# Altium PCB LSS-P-PCB-T v3.5.PcbDoc (part 4 of 5)
Units mil, origin at the board's own origin, x right, y up, seen from the top; angles counter-clockwise.
Board outline 2795.28 x 2795.28 mil, 4 copper layers (Top Layer, Power, Ground, Bottom Layer), stack 62.08 mil thick; 167 components, 123 nets, 589 pads, 650 vias.
Unrouted connection lines stored in the file: 2.
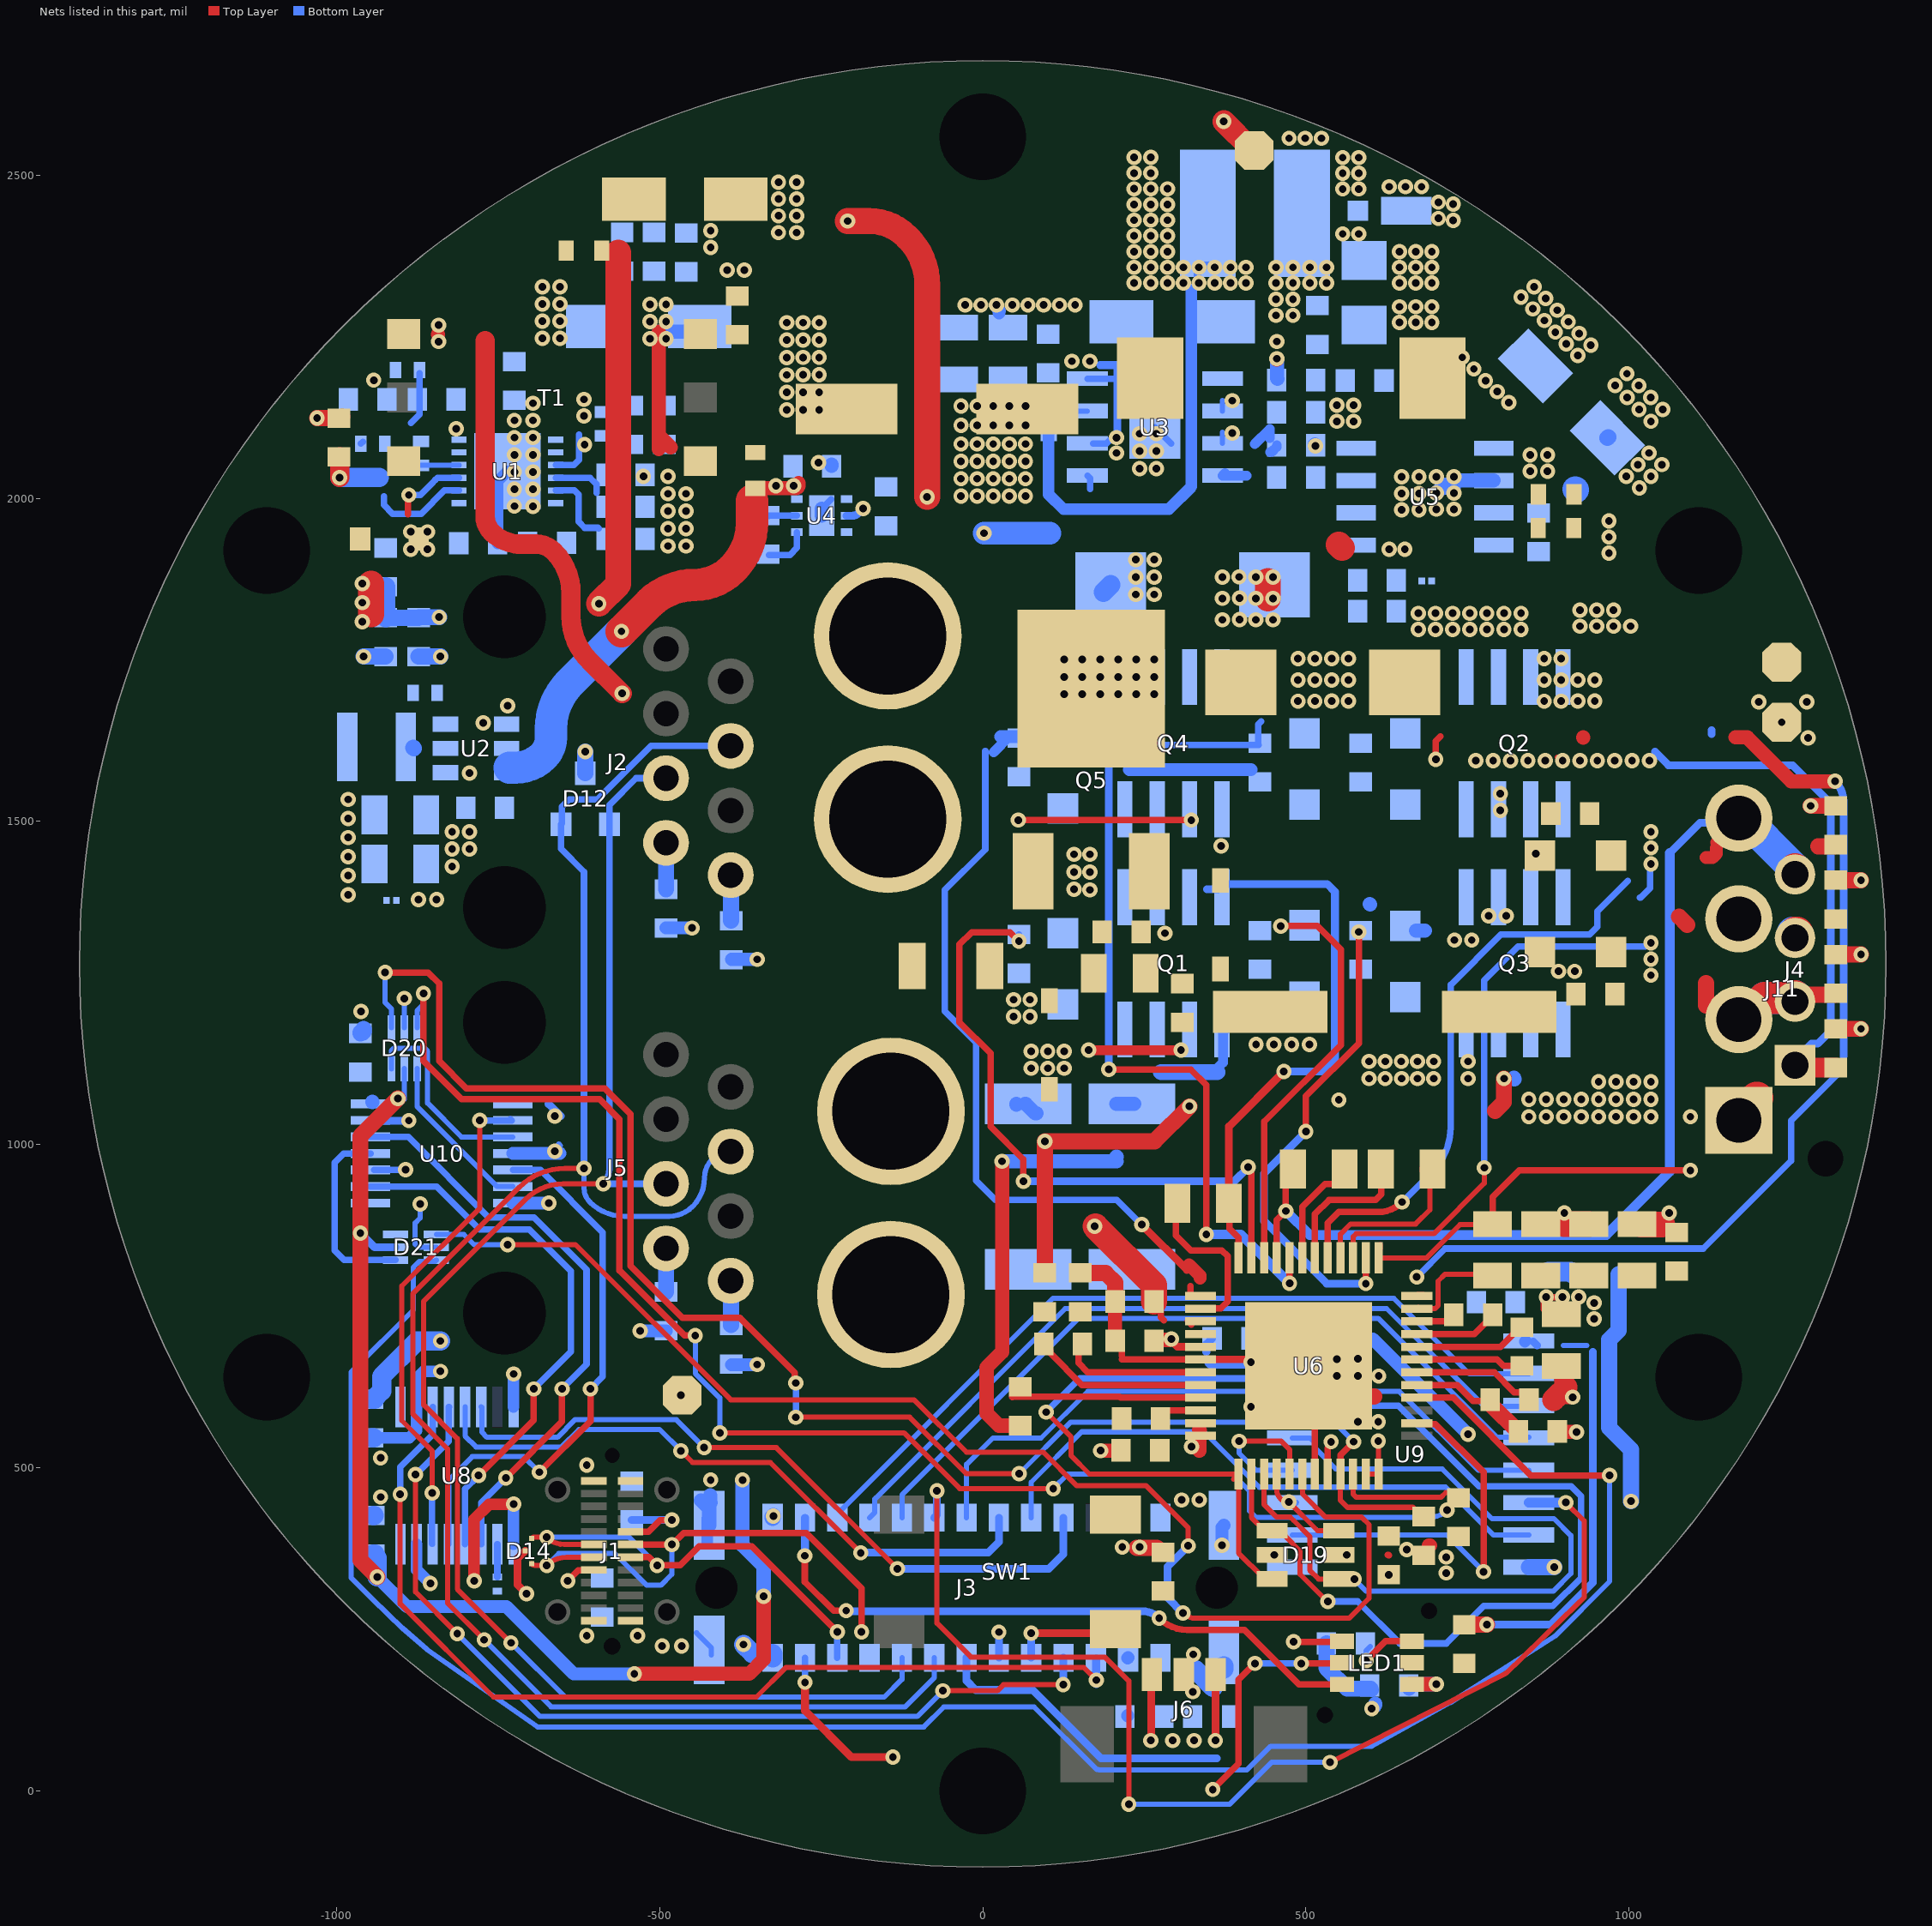
[diagram p4: the nets of this part, all layers, seen from the top]

## Part data (continued)
U5: "1.5-A boost, buck, inverting switching regulator, operation from 0°C to 70°C 8-SOIC 0 to 70", Case/Package=D, Manufacturer="Texas Instruments", Max Input Voltage=40V, Max Operating Temperature=70°C, Max Output Current=750mA, Min Input Voltage=3V, Min Operating Temperature=0°C, Min Output Voltage=1.55V, Output Current=1.5A, Package Quantity=1, Quiescent Current=4mA, Supplier Part Number 1=296-17765-1-ND, Switching Frequency=100kHz, Category="Power Supply Modules", ComponentLink1Description=https://datasheet.ciiva.com/7408/1862376-7408060.pdf?src-supplier=Newark, ComponentLink1URL=https://datasheet.ciiva.com/7408/1862376-7408060.pdf?src-supplier=Newark, ComponentLink2Description=https://datasheet.ciiva.com/2025/mc33063a-2025162.pdf?src-supplier=Digi-Key, ComponentLink2URL=https://datasheet.ciiva.com/2025/mc33063a-2025162.pdf?src-supplier=Digi-Key, ComponentLink3Description=https://datasheet.ciiva.com/2025/mc33063a-2025161.pdf?src-supplier=Digi-Key, ComponentLink3URL=https://datasheet.ciiva.com/2025/mc33063a-2025161.pdf?src-supplier=Digi-Key, ComponentLink4Description=https://datasheet.ciiva.com/2025/mc33063a-2025163.pdf?src-supplier=Digi-Key, ComponentLink4URL=https://datasheet.ciiva.com/2025/mc33063a-2025163.pdf?src-supplier=Digi-Key, Contact Plating=Gold, Lead Free="Lead Free", Manufacturer Part Number=MC34063ADR, Max Output Voltage=40V, Number of Outputs=1, Number of Pins=8, Output Type=Adjustable, Output Voltage=40V, Packaging="Tape and Reel", Pricing 1="1=0.78000, 10=0.68400, 25=0.64240, 100=0.52420, 250=0.48688, 500=0.41438, 1000=0.34206 (USD)", Radiation Hardening=No, REACH SVHC="No SVHC", RoHS=Yes, RoHS Compliant=Yes, Stock 1=17204, Supplier 1=Digi-Key, Synchronous Rectifier=No, Termination=SMD/SMT, Topology=Flyback,SEPIC, Weight=0.002561oz
U6: "IC MTR DRVR BIPOLAR 8-60V 48TQFP", Manufacturer=Trinamic, Supplier Part Number 1=1460-TMC5160A-TA-TCT-ND, Manufacturer Part Number=TMC5160A-TA-T, Pricing 1="1=6.83000, 10=6.13000, 25=5.79560, 100=5.02280, 250=4.76524, 500=4.27582, 1000=3.64500 (USD)", RoHS=Yes, Stock 1=15584, Supplier 1=Digi-Key
U8: "DGTL ISO 3000VRMS 4CH GP 16SSOP", LCSC Part Number=C544482, Supplier Part Number=595-ISO7740FDBQR, Category="Integrated Circuits (ICs)", ComponentLink1Description=LCSC, ComponentLink2Description=http://www.ti.com/general/docs/suppproductinfo.tsp?distId=10&amp;gotoUrl=http%3A%2F%2Fwww.ti.com%2Flit%2Fgpn%2Fiso7742&src-supplier=Digi-Key, ComponentLink2URL=http://www.ti.com/general/docs/suppproductinfo.tsp?distId=10&amp;gotoUrl=http%3A%2F%2Fwww.ti.com%2Flit%2Fgpn%2Fiso7742&src-supplier=Digi-Key, ComponentLink3Description=http://www.ti.com/lit/ds/symlink/iso7742.pdf?src-supplier=Digi-Key, ComponentLink3URL=http://www.ti.com/lit/ds/symlink/iso7742.pdf?src-supplier=Digi-Key, Item Type=IC, Pricing="1=2.67, 10=2.34, 50=2.34, 100=1.95, 1000=1.47, 10000=1.2 (USD)", RoHS=Yes, Stock=3733, Supplier=Mouser
U9: "AUTOMOTIVE, GENERAL-PURPOSE, 50-", LCSC Part Number=C5216383, Supplier Part Number=595-ISO6762FQDWRQ1, Category="Integrated Circuits (ICs)", ComponentLink1Description=LCSC, Item Type=IC, Pricing="1=3.36, 10=2.94, 50=2.94, 100=2.48, 1000=1.78, 10000=1.77 (USD)", RoHS=No, Stock=8302, Supplier=Mouser
U10: "IC BUS BUFFER TRI-ST QD 14TSSOP", Case/Package=TSSOP, High Level Output Current=-32mA, Low Level Output Current=64mA, Manufacturer="Texas Instruments", Max Operating Temperature=85°C, Max Supply Voltage=3.6V, Min Operating Temperature=-40°C, Min Supply Voltage=2.7V, Operating Supply Voltage=3.3V, Package Quantity=2000, Quiescent Current=7mA, Supplier Part Number 1=296-8660-1-ND, Category="Logic Gates", ComponentLink1Description=https://datasheet.ciiva.com/41455/001017258-da-01-en-ic-bus-buf-q-sn74lvth125pwr-tssop-14-tid-41455824.pdf?src-supplier=Conrad, ComponentLink1URL=https://datasheet.ciiva.com/41455/001017258-da-01-en-ic-bus-buf-q-sn74lvth125pwr-tssop-14-tid-41455824.pdf?src-supplier=Conrad, ComponentLink2Description=https://datasheet.ciiva.com/46442/1764295-46442090.pdf?src-supplier=Element14, ComponentLink2URL=https://datasheet.ciiva.com/46442/1764295-46442090.pdf?src-supplier=Element14, ComponentLink3Description=https://datasheet.ciiva.com/1834/sn74lvth125-1834408.pdf?src-supplier=Digi-Key, ComponentLink3URL=https://datasheet.ciiva.com/1834/sn74lvth125-1834408.pdf?src-supplier=Digi-Key, ComponentLink4Description=https://datasheet.ciiva.com/1834/sn74lvth125-1834407.pdf?src-supplier=Digi-Key, ComponentLink4URL=https://datasheet.ciiva.com/1834/sn74lvth125-1834407.pdf?src-supplier=Digi-Key, ComponentLink5Description=https://datasheet.ciiva.com/7795/sn74lvth125-7795066.pdf?src-supplier=Element14, ComponentLink5URL=https://datasheet.ciiva.com/7795/sn74lvth125-7795066.pdf?src-supplier=Element14, ComponentLink6Description=https://datasheet.ciiva.com/14301/scbs703i-14301146.pdf?src-supplier=Avnet, ComponentLink6URL=https://datasheet.ciiva.com/14301/scbs703i-14301146.pdf?src-supplier=Avnet, ComponentLink7Description=https://datasheet.ciiva.com/26263/sn74lvth125-26263836.pdf?src-supplier=Avnet+Europe, ComponentLink7URL=https://datasheet.ciiva.com/26263/sn74lvth125-26263836.pdf?src-supplier=Avnet+Europe, Contact Plating=Gold, Height=1.15mm, Lead Free="Lead Free", Length=5mm, Logic Function=Buffer,Inverting, Manufacturer Part Number=SN74LVTH125PWR, Mount="Surface Mount", Number of Bits=4, Number of Bits per Element=1, Number of Channels=4, Number of Elements=4, Number of Gates=4, Number of Input Lines=4, Number of Inputs=4, Number of Output Lines=3, Number of Outputs=4, Number of Pins=14, Output Current=64mA, Packaging="Tape and Reel", Polarity=Non-Inverting, Pricing 1="1=0.64000, 10=0.56000, 25=0.52560, 100=0.42910, 250=0.39856, 500=0.33920, 1000=0.28000 (USD)", Propagation Delay=2.1ns, Radiation Hardening=No, REACH SVHC="No SVHC", RoHS=Yes, RoHS Compliant=Yes, Stock 1=980, Supplier 1=Digi-Key, Turn-On Delay Time=2.1ns, Width=4.4mm

## Free pads (board coordinates)
  round 118.11 hole 133.86 unplated: MH1(0,2559.06) MH2(1108.1,1919.29) MH3(1108.1,639.76) MH4(0,0) MH5(-1108.1,639.76) MH6(-1108.1,1919.29)

## Via types
v1: diameter 23.62, hole 11.81, Top Layer to Bottom Layer, 643 vias
v2: diameter 23.62, hole 11.81, Top Layer to Bottom Layer, tented both sides, 7 vias

## Nets (pads, with @x,y where several pads share a name; then routed paths per layer and width w, separated by ;. In a path a pad name is that pad's centre, name@x,y a point inside that pad or via, vN(x,y) a via of type N, cw(c..) or ccw(c..) an arc to the next point about the centre after c; other vN are vias at no path point)
3V3: C44.2 C45.2 D16.2 FB4.1 L3.2 U2.1 | length 555.9
  Top Layer w40: v1(-594,1837) -563.81,1867.19 -563.81,2380.37
  other v1: -982,1386.5 -982,1416 -982,1445.5 -982,1475 -982,1504.5 -982,1534 -773.03,1652.4 -735,1679
3V3_M: C49.1 D18.2 FB3.1 L1.2 R39.2 | length 7.1
  Top Layer w40: 551,1928 556,1923
  other v1: 629,1921 653.19,1921
3V8: C11.1 C12.1 D2.1 FB2.1 R35.2
  other v1: -681.48,2247.57 -654.27,2247.57 -681.48,2274.14 -654.27,2274.14 -681.48,2300.7 -654.27,2300.7 -681.48,2327.27 -654.27,2327.27 -395.57,2353 -369,2353
5V: C34.1 J3.A1 U4.3 | length 566.2
  Top Layer w40: v1(-209,2429) -175.88,2429 cw(c-175.88,2347.2) -118.04,2405.04 -115.29,2402.29 cw(c-186,2331.58) -86,2331.58 v1(-86,2002)
  Bottom Layer w30: v1(-370,226.26) -356.39,212.64 -325.75,212.64 -325,211.9 J3.A1@-325,205.99
12V: C43.1 C55.1 D17.2 FB1.1 L2.1 R37.1
  other v1: 548,2119 574,2119 1034,2119 1015.5,2137.5 1052.3,2137.3 548,2144 574,2144 1033.8,2155.8 997,2156 978.5,2174.5 1015.3,2174.3 996.8,2192.8 453.87,2283 479.99,2283 453.87,2308 479.99,2308 453.87,2333 479.99,2333 506.1,2333 532.22,2333 645,2333 670,2333 695,2333 453.87,2357.26 479.99,2357.26 506.1,2357.26 532.22,2357.26 645,2357.3 670,2357.3 695,2357.3 645,2381.61 670,2381.61 695,2381.61 557,2409 582,2409 557,2478.59 582,2478.59 557,2502.85 582,2502.85 557,2527.12 582,2527.12 474,2557 499,2557 524,2557
30VDC: F1.2 P1.2 P2.2 | length 3.5
  Top Layer w22: P1.2@-180.71,1471.38 P1.2@-178.87,1469.53
  Top Layer w50: P1.2@-165,1478.37 P1.2@-164.39,1477.76
AH: C23.1 R7.2 U6.8 | length 271.3
  Top Layer w10: C23.1@94.29,691.37 104.29,681.37 104.29,677.4 153.84,627.84 U6.8@336.96,627.84
AL: C23.2 R6.2 U6.7 | length 226.9
  Top Layer w10: C23.2@154.29,691.37 148,685.09 148,662 162.47,647.53 U6.7@336.96,647.53
BH: C24.1 R8.2 U6.9 | length 291.9
  Top Layer w10: 45.78,609.44 46.01,609.67 211.49,609.67 213,608.16 U6.9@336.96,608.16
BL: C24.2 R9.2 U6.10 | length 67
  Top Layer w10: C24.2@270,588.47 U6.10@336.96,588.47
BOOT0: J3.A7 J6.1 RF4.1 | length 575.8
  Top Layer w12: v1@360,75 v1(360,77.81) J6.1@360.21,175.13
  Bottom Layer w12: J3.A7@-25,205.99 -25,170.25 -10.75,156 77.26,156 183.26,50 362,50 ; v1@357.78,72.78 v1@360,75
BOOT1: J3.A12 J6.3 RF3.1 | length 109.1
  Top Layer w12: v1(260.19,77.81) 260.99,78.61 260.99,179.33 J6.3@261.79,180.13
  Bottom Layer w12: RF3.1@220,115 RF3.1@223.31,111.69
  Bottom Layer w20: RF3.1@224,116 RF3.1@224.5,116.5 ; J3.A12@224.5,205.49 J3.A12@225,205.99
BUTTON: C2.2 J3.A9 SW1.3 | length 206.5
  Top Layer w8: C2.2@269,299 C2.2@269,315 ; C2.2@276.5,306 280.5,310 C2.2@283,310 ; C2.2@277.75,304.75 C2.2@283,310 ; C2.2@285.5,310 C2.2@283,310
  Top Layer w12: v1(75,244) 198.91,244 SW1.3@205.32,250.42
  Bottom Layer w8: J3.A9@74,204.99 J3.A9@75,205.99
  Bottom Layer w12: J3.A9@75,205.99 v1(75,244)
CAN_NH: D12.2 J2.4 J3.A6 J5.4 | length 2923
  Top Layer w8: v1(-771.37,233.63) -828,290.26 -828,529 -882,583 -882,769 -717.29,933.71 cw(c-646.58,863) -646.58,963 v1(-617,963)
  Bottom Layer w8: v1(-771.37,233.63) -667.74,130 -120,130 -74.81,175.19 -74.81,205.8 J3.A6@-75,205.99 ; v1@-617,971 v1(-617,963) -617,932.73 ccw(c-586.27,932.73) -608,911 ccw(c-554.89,964.11) -554.89,889 -485.27,889 ccw(c-485.21,940.21) -449,904 ccw(c-493.71,948.71) -430.48,948.73 ; -430.48,948.76 cw(c-390,948.71) J5.4@-390,989.19
  Bottom Layer w10: v1@-617,971 -617,1422 -652.4,1457.4 D12.2@-652.4,1495.63 -651.12,1496.91 -651.12,1522.88 -640,1534 -596,1534 -513.2,1616.8 J2.4@-390,1616.8
CAN_NL: D12.1 J2.5 J3.A5 J5.5 | length 2421.2
  Top Layer w8: v1(-730,229) -813,312 -813,545 -865,597 -865,757.56 -707.51,915.06 ; -707.49,915.08 cw(c-649.25,856.79) -649.25,939.19 v1(-587,939.19) ; J5.5@-490,939.19 J5.5@-490,951
  Bottom Layer w8: v1(-730,229) -646,145 -152.34,145 -125,172.34 J3.A5@-125,205.99
  Bottom Layer w10: J5.5@-490,939.19 v1(-587,939.19) ccw(c-609.7,961.89) -577.6,961.89 D12.1@-577.6,1495.63 -577.6,1525.4 -536.2,1566.8 J2.5@-490,1566.8
CII: R39.1 R40.1 U5.5
DIAG0_SWN: J3.B9 U9.7 | length 923.3
  Bottom Layer w8: J3.B9@75,422.53 75,477.43 152.97,555.4 342.37,555.4 427.96,469.81 716.19,469.81 790,396 U9.7@845.07,396
DIAG0_SWN#: U6.26 U9.10 | length 608.5
  Top Layer w10: U6.26@671.61,568.79 672.91,567.49 700.51,567.49 775,493 v1(775,339)
  Bottom Layer w8: U9.10@478.93,396 718,396 v1(775,339)
DRV_DIR: J3.B8 U8.5 | length 1012.7
  Top Layer w8: v1(-467,526) -449,508 -328.61,508 v1(-188.8,368.2)
  Bottom Layer w8: U8.5@-801,594 -801,549 -784,532 -651.79,532 -624.79,559 -500,559 v1(-467,526)
  Bottom Layer w12: v1(-188.8,368.2) -188.54,368.46 8.46,368.46 25,385 J3.B8@25,422.53
DRV_DIR#: D21.1 U6.18 | length 2076.9
  Top Layer w8: v1(-735,845) -630,845 -390,605 -106.26,605 -25.26,524 93.49,524 145.49,472 253,472 318,407 v1(318,379) ; v1(309.77,274.94) ccw(c328.94,294.1) 328.94,267 567,267 597.81,297.81 597.81,411.87 586.08,423.61 530.57,423.61 494.93,459.25 494.93,489.56 U6.18@494.44,490.05
  Bottom Layer w8: D21.1@-845.31,860.69 -802.76,860.69 -787.07,845 v1(-735,845)
  Bottom Layer w12: v1(309.77,274.94) 286,298.71 286,347 v1(318,379)
DRV_DIR##: U8.12 U10.9 | length 855.2
  Top Layer w10: v1(-780,488) -694.81,573.19 v1(-694.81,621.81)
  Bottom Layer w10: U10.9@-947.4,934.97 -844.97,934.97 -778.81,868.81 -701.81,868.81 -637,804 -637,679.62 v1(-694.81,621.81) ; U8.12@-801,381.4 -801,467 v1(-780,488)
DRV_DIR###: D21.6 U10.8
DRV_ENN: J3.B10 U8.6 | length 1115
  Top Layer w8: v1(-431,531) -319.35,531 v1(-132,343.65)
  Bottom Layer w8: U8.6@-776,594 -775.19,593.19 -775.19,555.19 -767,547 -658,547 -631,574 -474,574 v1(-431,531)
  Bottom Layer w12: v1(-132,343.65) 102.46,343.65 125,366.19 J3.B10@125,422.53
DRV_ENN#: D21.3 U6.28 | length 3252.8
  Top Layer w10: U6.28@671.61,608.16 728.19,608.16 848.35,488 v1(970,488)
  Bottom Layer w8: D21.3@-845.31,821.31 -847.21,819.41 -871.59,819.41 -881,810 -881,744 -977,648 -977,329.26 -943.53,295.79 -897.92,251.78 -860.27,219.24 -859.97,218.98 -688.45,98.81 -91.19,98.81 -60.38,129.62 79.6,129.62 176.22,33 179,33 180,32 408.56,32 445.56,69 601.81,69 723.33,136.38 ccw(c718,146) 723.9,136.71 885.18,239.14 970,323.96 v1(970,488)
DRV_ENN##: U8.11 U10.12 | length 911.7
  Top Layer w10: v1(-738,484) -651,571 v1@-651,622
  Bottom Layer w10: U10.12@-947.4,1011.74 -888.74,1011.74 -764.38,887.38 -694.38,887.38 -613,806 -613,660 v1@-651,622 ; U8.11@-776,381.4 -776,446 v1(-738,484)
  other v1: -651,621.81
DRV_ENN###: D21.4 U10.11 | length 298
  Bottom Layer w10: U10.11@-947.4,986.15 -989.13,986.15 -1003,972.28 -1003,836 -988.32,821.31 D21.4@-908.69,821.31
DRV_STEP: J3.B7 U9.5 | length 1049.9
  Bottom Layer w8: J3.B7@-25,422.53 -25,505 15.7,545.7 90.24,545.7 162.54,618 644.74,618 766.74,496 U9.5@845.07,496
DRV_STEP#: U6.17 U9.12 | length 233.2
  Top Layer w8: v1(396.71,540.91) 462,540.91 474.76,528.16 U6.17@474.76,490.05
  Bottom Layer w8: v1(396.71,540.91) 396.71,522.27 422.98,496 U9.12@478.93,496
FB: R37.2 R38.2 U3.4 | length 105.5
  Bottom Layer w15: U3.4@374.83,2038.77 U3.4@371.06,2035 408.44,2035 ; 421,2084 444,2107 R38.2@444,2093 ; R38.2@444.47,2071.47 445.74,2072 447.5,2072 455,2079.5 R38.2@455,2082
FB_ISO: C32.2 R3.2 R4.2 U1.8 | length 243.2
  Top Layer w30: v1(-995,2032) R4.2@-995,2064
  Bottom Layer w10: -926.5,2003 -926.5,1989.5 -913,1976 -868.72,1976 -832.72,2012 U1.8@-810.32,2012
  Bottom Layer w30: v1(-995,2032) -934,2032
GND: C1.2 C4.2 C5.2 C6.2 C7.2 C8.2 C9.1 C10.2 C13.2 C14.2 C15.2 C16.2 C18.2 C19.2 C21.2 C22.2 C29.2 C30.2 C37.1 C40.2 C41.1 C43.2 C48.2 C49.2 C50.1 C51.2 C52.2 C55.2 C57.2 C58.2 C59.2 C60.2 C61.2 CF3.1 D3.2 D15.2 D17.1 D18.1 D19.2 D20.2 D21.2 D22.1 DF2.2 P1.1 P2.1 P6.1 R4.1 R6.1 R9.1 R12.2 R13.2 R24.2 R30.2 R38.1 R40.2 RF5.2 U1.1 U1.2 U1.13 U3.2 U3.5 U3.9 U5.4 U6.6 U6.11 U6.12 U6.19 U6.23 U6.24 U6.30 U6.49 U8.9 U8.15 U9.9 U10.1 U10.4 U10.7 U10.10 U10.13 | length 2706.2
  Top Layer w8: U6.23@592.87,490.05 U6.24@612.55,490.05 612.55,540.45 v1(612,541)
  Top Layer w10: C29.2@205,696.3 215,686.3 215,672.86 ; 215,667.21 U6.6@336.96,667.21 355.98,667.42 U6.6@356.05,667.42 ; U6.49@425.89,668.15 447.06,667.21 U6.49@480.59,633.68 ; U6.49@480.64,633.64 535.28,579 545,579 545,600.66 U6.49@553,608.66 ; U6.19@514.13,490.05 U6.49@514.13,572 ; U6.30@671.61,647.53 791.47,647.53 822.6,616.4 835.29,616.4 845.29,606.4 C30.2@845.29,605.37
  Top Layer w12: U6.6@356.05,667.42 U6.49@420.94,668.11
  Top Layer w18: v1(-787,325) -787,420 -763.6,443.4 v1(-726,443.4)
  Top Layer w22: v1(182.31,526.31) 213.68,526.31 R9.1@214,526.63 ; 188.85,802.84 189,802.69 ; C29.2@204.5,704.97 204.93,749.39 204.93,750.5 C14.2@205,757 ; 335,526 335.31,526.31 335.31,548.41 336,549.1 336,557.5 335,558.5 ; 883.73,608.55 884.18,609 887.13,609 v1(913,609) ; 895.29,630.71 C18.2@895.29,657.37
  Top Layer w25: v1(-1030,2124) R4.1@-997,2124 ; R4.1@-999,2121.5 -996,2121.5 R4.1@-991,2126.5 ; R6.1@150.96,801.27 190.42,801.27 190.42,801.14 205.19,786.37 C14.2@205.19,762 ; U6.49@550,593 555,598 U6.49@555,610.66 ; U6.49@553,608.66 U6.49@504.29,657.37 551.44,610.21 605.79,610.21 ; v1(1281,1524) C60.2@1320,1524 ; C57.2@1320,1179 v1(1359,1179) ; C58.2@1320,1294 v1(1359,1294) ; C59.2@1320,1409 v1(1359,1409)
  Top Layer w30: C22.2@439.59,1200 C22.2@444.96,1205.37
  Top Layer w35: v1(373,2583) P6.1@415,2541 ; 883.5,605.37 887.13,609 902.5,624.37
  Top Layer w40: 900,877 C21.2@937.86,877 ; C16.2@1019,876.37 1051.37,876.37
  Bottom Layer w8: D20.2@-895,1180.69 v1(-895,1226) ; v1(-870.39,908) -870.39,886.31 -878.2,878.5 -878.2,845.69 -873.52,841 D21.2@-845.31,841 ; -656,1001 -653.5,998.5 ; U3.2@371.06,2135 371.06,2150.94
  Bottom Layer w10: U10.10@-942,960.5 -941.75,960.75 -892.75,960.75 -892,960 -888,960 v1@-887.5,960.5 ; U3.5@162,2035 166,2031 166,2014 ; U3.9@266.53,2110 U3.9@291.8,2084.72 ; 350,666 352.81,663.19
  Bottom Layer w12: U10.13@-947.07,1037 v1(-888,1037) ; -671.92,1062.92 v1@-653,1044 ; 346,679.03 346,691 C52.2@355,700
  Bottom Layer w18: U8.15@-876,381.4 -876,342 v1@-855,321 ; C7.2@-750.71,1930.37 -750.71,2026.33 U1.13@-735.52,2041.53 ; U8.9@-726,381.4 v1(-726,443.4)
  Bottom Layer w20: v1@-855,321 v1(-854.74,321) ; U10.7@-726.93,909.38 v1(-671.36,909.38) ; U10.4@-726.93,986.15 -655.85,986.15 v1@-654.97,987.03 ; v1@-657.2,989.26 v1@-654.97,987.03 ; v1@-654.09,986.15 v1@-654.97,987.03 ; v1@24.24,2291.76 26,2290 25,2289 25,2287 ; 352.81,663.19 v1(415,663.19)
  Bottom Layer w22: R38.1@514,2083 514,2082 v1(515,2081)
  Bottom Layer w25: C61.2@-963,1172 -963,1173.49 -959.01,1173.49 -958,1174.5 C61.2@-958,1178.5 ; v1(-958,1755) C10.2@-924,1755 ; C8.2@-873,1755 v1(-839,1755) ; D3.2@966.68,2093.32 D3.2@967.86,2094.5
  Bottom Layer w30: C51.2@-943,426 C51.2@-941.59,426 ; C48.2@186.79,1854.79 C48.2@198,1866
  other v1: 628.29,334.37 450.95,365 -931.69,454.6 323,532.59 580.36,571 612,571 415,594 612.71,641.74 548,642.19 580.36,642.19 548,668 580.36,668.25 900,894 1062,894 -893,961 -662,989.5 -662,1044 75,1118 100.61,1118 126.23,1118 75,1144 100.61,1144 126.23,1144 423,1155 450.5,1155 478,1155 505.5,1155 -962,1206 674,1797 700.5,1797 727,1797 753.5,1797 780,1797 806.5,1797 833,1797 674,1822 700.5,1822 727,1822 753.5,1822 780,1822 806.5,1822 833,1822 237,1851.05 265.29,1851.05 237,1877.97 265.29,1877.97 237,1904.89 265.29,1904.89 -724.69,1987.81 -696,1987.57 -724.69,2014.13 -696,2014.13 -525,2034 996,2034 -724.69,2040.7 -696,2040.7 242.8,2046 268.8,2046 1014,2052 -724.69,2067.27 -696,2067.27 1031,2070 242.8,2072.92 268.8,2072.92 -724.69,2093.84 -696,2093.84 242.8,2099.84 268.8,2099.84 -724.69,2120.4 -696,2120.4 -617.19,2127.6 -303,2136.71 -278.08,2136.95 -253.16,2136.95 -696,2146.97 386.06,2150.94 -617.19,2153 -303,2164 -278.08,2163.87 -253.16,2163.87 -303,2190.71 -278.08,2190.95 -253.16,2190.95 -303,2217.71 -278.08,2217.87 -253.16,2217.87 -303,2244.71 -278.08,2244.79 -253.16,2244.79 -303,2271.71 -278.08,2271.71 -253.16,2271.71 645,2272 670,2272 695,2272 645,2296.26 670,2296.26 695,2296.26 -27.2,2299 -2.9,2299 21.41,2299 45.71,2299 70.01,2299 94.32,2299 118.62,2299 142.92,2299 728,2430 705,2433 728,2455 705,2458 629,2482 654,2482 679,2482
  other v2: 1016,2016 1034,2034 1051,2052
HA1: D4.2 R14.2 U6.41 | length 949.8
  Top Layer w10: U6.41@533.81,824.69 533.81,878.43 550.81,895.43 611.4,895.43 ccw(c611.4,948.6) v1(649,911)
  Bottom Layer w10: v1(649,911) 694.71,956.71 ccw(c624,1027.42) 724,1027.42 724,1247 802,1325 939.28,1325 951,1336.72 951,1361 998,1408 ; 1017,1382 1018,1382 1032.5,1396.5 v1@1032.5,1427
  other v1: 1034,1434 1034,1459 1034,1484
HA2: D5.2 R15.1 U6.36 | length 1510.3
  Top Layer w10: U6.36@671.61,765.64 671.78,765.64 673.08,766.94 U6.36@681.94,766.94 ; v1(701,1596) 701,1624 708.5,1631.5
  Top Layer w22: 928.88,1630.25 929.38,1629.75 ; 1165,1630 1183,1630 1251,1562 v1(1319,1562)
  Bottom Layer w10: v1(671.61,795) 715.61,839 1115,839 1251,975 1251,1037 1332,1118 1332,1137
  Bottom Layer w12: v1(1319,1562) cw(c1287.62,1530.62) 1332,1530.62 1332,1137
HB1: D6.2 R18.2 U6.1 | length 1242.4
  Top Layer w10: 321.52,781.08 321.52,766.94 322.82,765.64 U6.1@336.96,765.64
  Top Layer w12: v1@246.69,875.31 316,806
  Top Layer w20: 319.29,814 336.29,797 336.29,793.37
  Bottom Layer w10: 4,1609 4,1456.67 -58.54,1394.13 -58.54,1206.34 -10,1157.81 -10,944 19.62,914.38 207.62,914.38 v1(246,876)
  Bottom Layer w15: 17,1607 R18.2@41,1631
  Bottom Layer w20: 28,1631 41,1631 85.5,1631
HB2: D10.2 R19.1 U6.44 | length 1344
  Top Layer w10: v1@195.22,1116.22 321.78,1116.22 346,1092 v1(346,861) ; v1(474.76,785.46) U6.44@474.76,824.69
  Bottom Layer w10: 213,1617.96 R19.1@427,1617.96 ; R19.1@426,1617.96 426,1650 431,1655
  Bottom Layer w12: v1(195,1116.22) 195,1616
  Bottom Layer w15: v1(346,861) 399.22,861 v1(474.76,785.46)
"IPK SNS": R41.1 U5.1 U5.7 U5.8
ISO_GND: C2.1 C11.2 C12.2 C33.2 C34.2 C37.2 C39.1 C44.1 C45.1 C53.2 C54.2 D12.3 D13.2 D14.1 D16.1 J1.A1 J1.A12 J1.B1 J1.B12 J3.A13 J3.B12 J3.B13 J3.MP1 J3.MP2 J3.MP3 J3.MP4 J6.2 R1.1 R2.1 R5.1 R11.2 R22.1 R25.2 R27.1 R35.1 SW1.1 U2.4 U4.1 U4.7 U8.2 U8.8 U9.8 | length 1328.1
  Top Layer w12: D14.1@-707.92,371 -720,358.92 -720,319 v1(-706,305) ; J6.2@308,174.13 308,178 J6.2@309,179
  Top Layer w25: SW1.1@216.32,427.58 SW1.1@229.74,441 ; v1@238,376 269.5,376 276.5,369 C2.1@279,369
  Bottom Layer w8: J3.MP3@-442.85,244.3 -420.09,221.53 J3.MP3@-420.09,210.22
  Bottom Layer w10: U4.7@-249.1,1983.87 U4.7@-234.42,1998.55
  Bottom Layer w18: C53.2@-945,546 -887.47,546 -876,557.47 -876,638.46 -865.46,649 v1(-839,649) ; U8.8@-726,594 v1(-726,645) ; J3.MP4@-426,384 J3.MP4@-426,421.5
  Bottom Layer w20: v1(-530,711.49) R25.2@-490,711.49 ; R11.2@-490,1335 v1(-450,1335) ; R27.1@-389,659.49 v1(-349,659.49) ; R22.1@-389,1286.51 v1(-349,1286.51) ; v1(370,380) 370,407.49 J3.MP2@373.23,410.71
  Bottom Layer w22: J3.MP4@-435.85,449.37 J3.MP4@-423.23,436.75 ; J3.MP4@-423.23,410.71 J3.MP4@-423.23,436.75 ; J3.MP4@-421.71,457.37 -421.71,446.71 -421,446 -423.23,443.77 J3.MP4@-423.23,436.75 ; U4.7@-249.1,1972.96 U4.7@-249.1,1983.87 ; C33.2@-233.71,2049.87 C33.2@-233.71,2052.37
  Bottom Layer w25: D12.3@-615,1574.37 v1(-615,1608) ; U9.8@845.07,346 v1(884.44,346) ; 874.5,803.13 906.41,803.13 911.78,797.77 ; 984,799.06 984,712.42 969.5,697.92 969.5,561.5 1003,528 v1(1003,448)
  Bottom Layer w30: C53.2@-945,546 C53.2@-942.5,546 ; 329.5,187 356.5,160 ; J3.MP1@373,188.5 J3.MP1@373,193 ; 875.5,803.13 909.97,803.13
  other v1: 325,153.27 326,211 -496,224 -466,224 -612.69,240 -534,240 216,377 243,377 308,450 335,450 -421,481 -612.69,504 -931.69,515 -873,1379 -845,1379 -821,1430 -821,1457.5 -794,1457.5 -821,1484 -794,1484 -794,1574.81 -254,2055 -421,2388 -316,2411 -288,2411 -421,2414 -316,2437 -288,2437 -316,2463 -288,2463 -316,2489 -288,2489
LA1: D8.2 R16.2 U6.39 | length 867
  Top Layer w8: U6.39@573.18,824.69 573.18,857.31 577.87,862 698,862 776,940 v1(776,964)
  Bottom Layer w10: v1(776,964) 776,1254 828.44,1306.44 1025.46,1306.44 v1@1034.02,1315
  other v1: 1034.02,1262 1034.02,1287 1034.02,1312
LA2: D9.2 R17.1 U6.38 | length 759.7
  Top Layer w10: v1(500,1020) 500,1074.54 582,1156.54 v1(582,1329) ; v1@592.87,784.81 U6.38@592.87,824.69
  Bottom Layer w12: v1(500,1020) 435.39,955.39 435.39,881.61 532.19,784.81 v1(592.73,784.81)
  Bottom Layer w22: 599,1372 599.31,1371.69 ; D9.2@670.22,1330.68 684,1330.68
LB1: D7.2 R20.2 U6.47 | length 1021.3
  Top Layer w10: v1(56,1314.8) 42.29,1328.5 -17.03,1328.5 -35.88,1309.65 -35.88,1188.9 12,1141.02 12,1028 63,977 v1(63,943.19) ; v1(410.81,965) cw(c399,953.19) 415.7,953.19 U6.47@415.7,824.69
  Bottom Layer w10: R20.2@54.2,1316.8 56,1316.8 R20.2@56,1325
  Bottom Layer w12: v1(63,943.19) 389,943.19 v1(410.81,965)
LB2: D11.2 R26.1 U6.46 | length 634.3
  Top Layer w10: U6.46@435.39,824.69 435.39,1035.39 554,1154 554,1302 518,1338 v1(461,1338)
LED_B: J3.A8 LED1.1 | length 114.5
  Top Layer w10: v1(481,230.46) LED1.1@555.87,230.46
  Bottom Layer w12: J3.A8@25,205.99 v1(25,245.58)
LED_G: J3.B2 LED1.3 | length 992.9
  Top Layer w10: v1(-275.34,363.66) -275.34,323.34 -230.69,278.69 v1(-211.32,278.69) ; v2(273,267) ccw(c316.46,310.46) 316.46,249 405,249 489.46,164.54 LED1.3@555.87,164.54
  Bottom Layer w12: v1@-277.34,363.66 -275,366 J3.B2@-275,422.53 ; v1(-211.32,278.69) -210.44,277.81 246.9,277.81 cw(c246.9,240.9) 260.98,275.02 cw(c246.9,240.9) v2(273,267)
LED_R: J3.A2 LED1.2 | length 602.5
  Top Layer w10: v1(356,2) 396,42 396,171.84 v1(421.16,197) ; v1(493,197) LED1.2@553.87,197
  Top Layer w12: v1(-275,167.81) -275,166.62 -275,164.19 -275,124 -203,52 v1(-139,52)
  Bottom Layer w10: v1(-275,167.81) J3.A2@-275,205.99 ; v1(421.16,197) v1(493,197)
MA1: C26.1 C57.1 J4.1 J11.1 Q2.1 Q3.7 Q3.8 U6.40 | length 1124.8
  Top Layer w8: U6.40@553.5,824.69 553.5,861.27 569.23,877 670,877 692,899 692,959.66 C26.1@691.29,960.37 ; C26.1@698.29,942.37 C26.1@698.29,951.37 ; v1@888.76,1599 v1@900,1599
  Top Layer w22: C26.1@696,962 C26.1@700,966
  Top Layer w30: C26.1@691.29,960.37 C26.1@691.29,962.37 ; J4.1@1257,1130.57 1268.57,1119 C57.1@1320,1119
  Top Layer w50: J11.1@1170,1045.19 1196.97,1072.16 J11.1@1198.58,1072.16
  Bottom Layer w12: 1040,1608 1061,1587 1253.09,1587 1312,1528.09 1312,1176 1291.87,1155.87 1282.3,1155.87 J4.1@1257,1130.57 ; 1128,1635 1128,1641
  other v1: 763,1594 789.86,1594 816.71,1594 843.57,1594 870.43,1594 897.29,1594 924.14,1594 951,1594 977.86,1594 1004.71,1594 1031.57,1594
MA2: C27.1 C58.1 J4.2 J11.2 Q2.3 Q3.5 Q3.6 U6.37 | length 899.5
  Top Layer w8: U6.37@612.55,824.69 687.07,824.69 738.37,876 C27.1@791,876 ; U6.37@612.55,836.07 614.85,838.37 U6.37@614.85,844.71
  Top Layer w10: C27.1@789,877 789,919 830,960 v1(1095,960)
  Top Layer w25: 1077.5,1352.5 1090,1340 ; 1119.25,1215.25 1119.25,1249.75 ; J11.2@1159.09,1201.09 J11.2@1170,1201.09 ; J4.2@1257,1229 1259.94,1231.94 1317.94,1231.94 C58.1@1320,1234
  Top Layer w50: J11.2@1170,1201.09 1184.6,1201.09 1210.09,1226.59 1254.59,1226.59 J4.2@1257,1229
  Bottom Layer w50: J11.2@1170,1201.09 1184.6,1201.09 1210.09,1226.59 1254.59,1226.59 J4.2@1257,1229
  other v1: 1095,1043 783,1354 810,1354 801,1517 801,1543
MB1: C28.1 C59.1 J4.3 J11.3 Q1.7 Q1.8 Q4.1 U6.48 | length 914.9
  Top Layer w10: C28.1@382.11,905.92 382.11,869.89 395.9,856.1 395.9,843.71 396.02,843.59 U6.48@396.02,824.69
  Top Layer w12: C28.1@381,909.03 381,1028 v1(466,1113)
  Top Layer w50: J11.3@1170,1357 J11.3@1180.32,1346.68 ; J4.3@1257,1327.43 J4.3@1260.41,1327.43
  Bottom Layer w12: 347.06,1395.06 364.19,1395.06 370,1400.87 370,1403 533,1403 545,1391 545,1133 525,1113 v1(466,1113)
  Bottom Layer w50: J11.3@1170,1357 J11.3@1180.32,1346.68 ; J4.3@1253.59,1327.43 J4.3@1257,1327.43
  other v1: 369,1462
MB2: C31.1 C60.1 J4.4 J11.4 Q1.5 Q1.6 Q4.3 U6.45 | length 1662.2
  Top Layer w10: U6.45@455.07,824.69 455,824.77 455,883 v1(469,897) 469,951 C31.1@480,962
  Top Layer w12: J11.4@1170,1501 J11.4@1170,1512.91
  Top Layer w20: 1119,1444 1129,1444 1135,1450 1135,1459 ; J11.4@1136,1467 J11.4@1170,1501
  Top Layer w25: 1292.65,1461.5 1317.5,1461.5 C60.1@1320,1464
  Bottom Layer w12: 1063,1451 1109.98,1497.98 1155.07,1497.98 J11.4@1170,1512.91
  Bottom Layer w15: v1(469,897) 506,860 965,860 1063,958 1063,1451
  Bottom Layer w50: J11.4@1170,1512.88 J4.4@1257,1425.88
  other v1: 730,1316.33 756.66,1316.33 282,1327
MISO: J3.B6 U9.6 | length 1800.4
  Top Layer w8: v1(-70.76,463.98) -70.76,259.41 -18.34,207 189,207 226,170 v1(226,-21) ; v1(537.58,44) 808.92,181.45 ccw(c805.3,188.59) 810.87,182.85 918.74,287.48 930.79,299.52 930.79,417.4 v1(902.19,446)
  Bottom Layer w8: v1(226,-21) 382,-21 447,44 v1(537.58,44)
  Bottom Layer w12: J3.B6@-75,422.53 -70.76,426.77 v1(-70.76,463.98)
  Bottom Layer w15: U9.6@845.07,446 v1(902.19,446)
MISO#: D19.6 U6.16 U9.11 | length 154.4
  Top Layer w8: U6.16@457.37,487.75 U6.16@455.07,490.05 455.07,465.45 ccw(c473.52,465.45) v1(473.52,447) 518.12,402.4 D19.6@551.1,402.4
  Bottom Layer w8: U9.11@484.87,444.94 U9.11@485.93,446
MOSI: J3.B5 U9.4 | length 1195
  Bottom Layer w8: J3.B5@-125,422.53 -125,458 148.09,731.09 611.91,731.09 796.13,546.87 U9.4@845.07,546.87
MOSI#: D19.4 U6.15 U9.13 | length 1136.7
  Top Layer w8: U6.15@435.39,471.03 435.39,442.74 454.52,423.61 475.7,423.61 480.97,418.33 506,393.3 506,341.21 519.61,327.6 D19.4@551.1,327.6 D19.4@554.1,327.6
  Bottom Layer w8: U9.13@478.93,546 506.49,546 514.3,538.19 514.3,530 546.3,498 711,498 788,421 884,421 910,395 910,336.08 883.11,309.19 592.81,309.19 575,327 v1(575,327.6)
NetC3_1: C3.1 U1.10 | length 58.8
  Bottom Layer w8: C3.1@-869,2051 -868.81,2051.19 -810.51,2051.19 U1.10@-810.32,2051.37
NetC9_2: C9.2 U1.6
NetC17_1: C17.1 U6.31 | length 171.8
  Top Layer w10: U6.31@671.61,667.21 795.83,667.21 805.67,657.37 C17.1@839.29,657.37
NetC17_2: C17.2 U6.32 | length 175.3
  Top Layer w10: U6.32@671.61,686.9 801.31,686.9 831.79,717.37 C17.2@834.29,717.37
NetC20_1: C20.1 U6.34 | length 60.4
  Top Layer w10: U6.34@671.61,726.27 C20.1@731.96,726.27
NetC26_2: C26.2 U6.42 | length 222.5
  Top Layer w10: U6.42@514.13,824.69 514.13,892.42 536.08,914.37 608.34,914.37 616.83,922.86 616.83,961.17 C26.2@616,962
NetC27_2: C27.2 U6.35 | length 167.9
  Top Layer w8: U6.35@673.91,748.25 U6.35@671.61,745.95 699.95,745.95 704.62,750.62 704.62,788.62 715,799 789,799 C27.2@792,799
NetC28_2: C28.2 U6.2 | length 274
  Top Layer w10: C28.2@299,923.03 299,859 322,836 370.14,836 379,827.14 379,757 368.22,746.22 337.23,746.22 U6.2@336.96,745.95
NetC31_2: C31.2 U6.43 | length 150.5
  Top Layer w10: U6.43@494.44,824.69 494.44,903.44 530.04,939.04 C31.2@551.49,939.04
NetC32_1: C32.1 C36.1 R36.1 | length 86.3
  Bottom Layer w10: C32.1@-962.21,2084.37 C32.1@-959.27,2087.31 ; -885,2116.73 -871.71,2130.01 C36.1@-871.71,2193.37
NetC35_1: C35.1 U4.5 | length 43.5
  Bottom Layer w10: C35.1@-330.71,1972.37 -330.12,1972.96 U4.5@-287.49,1972.96
NetC35_2: C35.2 U4.4 | length 71.9
  Bottom Layer w10: C35.2@-330.71,1912.37 -298.21,1912.37 -287.49,1923.1 U4.4@-287.49,1947.37
NetC38_1: C38.1 L3.1 U2.5 | length 1.4
  Bottom Layer w25: L3.1@-881,1614 L3.1@-880,1613
NetC38_2: C38.2 U2.6
NetC42_2: C42.2 RF5.1
NetC46_1: C46.1 U3.7 | length 66.2
  Bottom Layer w8: C46.1@96,2134.5 96.25,2134.75 161.75,2134.75 U3.7@162,2135
NetC50_2: C50.2 U5.3
NetC62_1: C62.1 D22.2 Q5.1 R21.1 R24.1
NetD2_2: D2.2 T1.6 | length 277.2
  Top Layer w22: -501.48,2076.37 -501.48,2258 ; -501.48,2097.37 -482.48,2078.37
  Bottom Layer w22: -501.48,2258 -437,2258 D2.2@-434,2261
  other v1: -515,2246.87 -490,2246.87 -515,2273.43 -490,2273.43 -515,2300 -490,2300
NetD3_1: D3.1 L1.1 U5.2 | length 124
  Bottom Layer w22: v1@701.5,2007.5 v1@710,2016 ; U5.2@790.58,2027.37 734,2027.37 729,2022.37 v1@729,2016 ; v1@710,2016 v1@729,2016 ; v1@710,2016 714.81,2020.81 724.19,2020.81 v1@729,2016
  other v1: 648,1982 675,1982 702,1983 729,1983 648,2007.5 675,2007.5 702,2008 729,2008 648,2033 675,2033 702,2033 729,2033 814,2148 796,2165 796,2165 778,2182 760,2200 742,2218 921,2221 941,2237 903,2239 923,2255 886,2257 906,2273 869,2275 889,2291 851,2293 871,2309 833,2311 853,2327
NetD4_1: D4.1 Q2.2 R14.1
  other v1: 856,1450
NetD5_1: D5.1 Q2.4 R15.2
NetD6_1: D6.1 Q4.2 R18.1 | length 267.8
  Top Layer w10: v1(55,1502) v1(322.81,1502)
NetD7_1: D7.1 Q1.2 R20.1 | length 142.8
  Top Layer w15: v1(164,1146.03) v1(306.81,1146.03)
NetD8_1: D8.1 Q3.2 R16.1
  other v1: 891,1268 916,1268
NetD9_1: D9.1 Q3.4 R17.2
  other v1: 597.74,1102 622.74,1102 648,1102 672.74,1102 697.74,1102 751,1102 597.74,1128.66 622.74,1128.66 647.74,1128.66 672.74,1128.66 697.74,1128.66 751,1128.66
NetD10_1: D10.1 Q4.4 R19.2 | length 188
  Bottom Layer w20: 227,1580 415,1580
NetD11_1: D11.1 Q1.4 R26.2
NetJ1_A5: J1.A5 R1.2 | length 47.2
  Top Layer w10: v1(-642,325) -626.17,340.83 -602.6,340.83 J1.A5@-601.69,341.74
NetJ1_B5: J1.B5 R2.2 | length 133.5
  Top Layer w10: J1.B5@-545,400.8 -517.2,400.8 -499,419 v1(-481,419)
  Bottom Layer w12: R2.2@-543,419 v1(-481,419)
NetJ2_7: J2.7 R11.1 | length 71.8
  Bottom Layer w25: R11.1@-490,1395 J2.7@-490,1466.8
NetJ2_8: J2.8 R22.2 | length 83
  Top Layer w25: J2.8@-399.78,1418 J2.8@-388,1418
  Bottom Layer w18: J2.8@-390,1416.8 J2.8@-389.5,1416.3 ; R22.2@-389.5,1346.5 R22.2@-389,1346
  Bottom Layer w25: R22.2@-389.5,1346.5 J2.8@-389.5,1416.3
NetJ5_7: J5.7 R25.1 | length 67.2
  Bottom Layer w25: R25.1@-490,772 J5.7@-490,839.19
NetJ5_8: J5.8 R27.2 | length 69.6
  Bottom Layer w12: J5.8@-390,789.19 J5.8@-389.5,788.69 ; R27.2@-389.5,720.5 R27.2@-389,720
  Bottom Layer w25: R27.2@-389.5,720.5 J5.8@-389.5,788.69
NetLED1_4: LED1.4 R46.1 | length 87.8
  Top Layer w22: LED1.4@660.6,165 v1(702,165)
  Bottom Layer w22: R46.1@660,158 660,160.5 664,164.5 676.39,164.5 676.89,165 v1(702,165)
NetLED1_5: LED1.5 R34.1
NetLED1_6: LED1.6 R33.1 | length 108.1
  Top Layer w10: v1(593.38,201.38) 623.46,231.46 LED1.6@664.13,231.46
  Bottom Layer w8: v1(593.38,201.38) 593.38,216.88 R33.1@600,223.5
NetR5_2: R5.2 T1.4
NetR10_2: R10.2 U8.10 | length 50.6
  Bottom Layer w10: R10.2@-751,330.83 U8.10@-751,381.4
NetR29_1: R29.1 R30.1 U1.4 | length 80.5
  Bottom Layer w10: U1.4@-660.71,2031.69 -607.71,2031.69 -597.71,2021.69 -597.71,2008.37
NetR31_1: R31.1 U1.5 | length 115.6
  Bottom Layer w10: U1.5@-660.71,2012 -632,2012 -625.45,2005.45 -625.45,1963.73 -615.96,1954.25 -595.27,1954.25 R31.1@-594,1952.98
NetR32_1: R32.1 T1.3 | length 0.4
  Top Layer w22: v1@-843.03,2253.68 v1@-842.71,2253.37
  other v1: -842,2242.4 -842,2267.8
SPI_CS: J3.B3 U9.2 | length 1246.7
  Bottom Layer w8: J3.B3@-217.94,435.5 108.57,762 636,762 753,645 U9.2@845.07,645
SPI_CS#: D19.3 U6.13 U9.15 | length 950.1
  Top Layer w8: v1(98.14,585.86) 136.84,547.16 136.84,518.35 165.19,490 388,490 ; 388,482.03 U6.13@392.51,486.54 ; 389,490.05 U6.13@392.51,486.54 ; U6.13@396.02,490.05 U6.13@392.51,486.54 ; D19.3@434,329.74 396,367.74 396,483.05 393.3,485.75 U6.13@392.51,486.54
  Top Layer w10: U6.13@396.02,490.05 U6.13@396.81,489.26
  Bottom Layer w8: U9.15@478.93,638 U9.15@485.93,645
  Bottom Layer w10: v1(98.14,585.86) 150.28,638 U9.15@478.93,638
SPI_SCK: J3.B4 U9.3 | length 1229
  Bottom Layer w8: J3.B4@-175,422.53 -166.99,430.53 -166.99,451.49 127.6,746.09 624.91,746.09 776,595 U9.3@845.07,595
SPI_SCK#: D19.1 U6.14 U9.14 | length 1353.8
  Top Layer w8: U6.14@415.7,490.05 415.7,422.84 436.14,402.4 D19.1@447.95,402.4 456.16,394.2 467.97,394.2 491,371.17 491,335 533,293 v1(534,293)
  Bottom Layer w10: U9.14@478.93,596 478.52,595.59 643.41,595.59 768,471 910.86,471 926,455.86 926,329.46 882.27,285.73 775.05,285.73 717.33,228 645,228 580,293 v1(534,293)
SRAH: Q3.1 Q3.3 R7.1 R12.1 | length 533.1
  Top Layer w25: R7.1@95.96,801.27 v1(96,1005) 266,1005 v1(320,1059) ; 793,1052 806.5,1065.5 v1(806.5,1102)
  Bottom Layer w22: R12.1@52.28,1061.71 R12.1@52.28,1062.95 ; R12.1@65.28,1062.95 66.5,1062.95 81.25,1048.2 R12.1@83.25,1048.2 ; 822,1101.97 822,1103.66 ; 822.69,1100.85 822.69,1101.29
  other v1: 551,1069
SRBH: Q1.1 Q1.3 R8.1 R13.1 | length 815.4
  Top Layer w22: v1(30,974) 30,679 6,655 6,584 25,565 R8.1@58,565
  Bottom Layer w15: 362.9,1118 371.69,1126.79 371.69,1173.69 Q1.1@376,1178
  Bottom Layer w22: v1@31,974 207,974 ; R13.1@206.86,1062.95 R13.1@234.16,1062.95
  Bottom Layer w25: 276,1112 362.9,1112
SW: C3.2 R36.2 T1.1 U1.11 U1.12
  other v1: -814.71,2107.37
TMC_1: J3.A11 U8.3 | length 1531.7
  Top Layer w8: v1(-901.36,458.81) -901.36,289.36 -757,145 -350.25,145 -304.63,190.62 156.61,190.62 v1(176,171.23)
  Bottom Layer w8: J3.A11@175,205.99 J3.A11@176,204.99
  Bottom Layer w10: v1(-901.36,458.81) -901.36,501.01 -851,551.37 U8.3@-851,594
  Bottom Layer w12: v1@176,164.73 175.5,165.23 175.5,204.49 J3.A11@176,204.99
TMC_1#: D20.1 RF1.1 U6.21 | length 2432.4
  Top Layer w8: v1(-289.14,578) -113,578 -25.69,490.69 v1(56.44,490.69) ; U6.21@553.5,490.05 553.5,449.5 564.39,438.61 665.55,438.61 674.29,429.87 RF1.1@676.79,429.87
  Top Layer w10: v1(-924.6,1266.19) -858.19,1266.19 -841,1249 -841,1129 -799.03,1087.03 -585.03,1087.03 -545,1047 -545,812.04 -464.96,732 -376,732 -291.01,647.01 -291.01,632.83 v1(-289.14,630.96) ; U6.21@553.5,490.05 553.5,519.63 v1(574,540.14)
  Bottom Layer w8: v1(-924.6,1266.19) -924.6,1219.6 -914.69,1209.69 D20.1@-914.69,1180.69 ; v1(56.44,490.69) 136.15,570.4 543.73,570.4 v1(574,540.14)
  Bottom Layer w10: v1@-289.14,578.42 v1(-289.14,630.96)
TMC_1##: U8.14 U10.2 | length 775.4
  Top Layer w8: v1(-852,461) -852,526 -899,573 -899,781 -778.12,901.88 v1@-778.12,1037
  Bottom Layer w8: U8.14@-852,382.4 U8.14@-851,381.4
  Bottom Layer w10: U8.14@-852,382.4 v1(-852,461) ; v1@-778,1037.22 U10.2@-730.79,1037.22 ; U10.2@-730.79,1039.22 U10.2@-728.9,1037.33
  other v1: -778.12,1037.22
TMC_1###: D20.6 U10.3 | length 321.4
  Bottom Layer w8: D20.6@-914.69,1117.31 -914.69,1145.69 -911.37,1149 -863.69,1149 -859,1144.31 -859,1064 -806.74,1011.74 U10.3@-726.93,1011.74
TMC_2: J3.A10 U8.4 | length 1452
  Top Layer w8: v1(-877.55,489.35) -877.55,307.55 v1(-813,243) ; v1(-61.52,154.74) 22.74,154.74 32.19,164.19 v1(124.5,164.19)
  Bottom Layer w8: v1(-813,243) -685,115 -101.26,115 v1(-61.52,154.74)
  Bottom Layer w10: v1(-877.55,489.35) -826.35,540.54 -826.35,593.65 U8.4@-826,594
  Bottom Layer w12: v1(124.5,164.19) 124.5,205.49 J3.A10@125,205.99
TMC_2#: D20.3 RF2.1 U6.22 | length 2506.5
  Top Layer w8: v1(-406.78,553.81) -121.81,553.81 -35.6,467.6 v1(109.09,467.6) ; U6.22@573.18,490.05 573.48,489.75 573.48,458.69 578.16,454 709,454 716.5,461.5 ; v1(718.6,434.41) 718.6,438.18 722.79,442.37 737,442.37 730.73,448.64 730.16,448.64 728.76,450.45 RF2.1@722.79,458.18
  Top Layer w10: v1(-865.34,1233.62) -865.34,1129.23 -806.14,1070.03 -593.03,1070.03 -562.19,1039.19 -562.19,805.19 -461.41,704.41 v1(-444.78,704.41)
  Bottom Layer w8: D20.3@-875.32,1180.69 -875.15,1180.86 -875.15,1206.89 -865.34,1216.7 v1(-865.34,1233.62) ; v1(-444.78,704.41) -444.78,645.78 -406.78,607.78 v1(-406.78,553.81) ; v1(109.09,467.6) 131.49,490 386.56,490 413,463.56 413,432.96 422.96,423 691.05,423 ccw(c691.05,461.96) v1(718.6,434.41) v1@717.51,434.41
TMC_2##: U8.13 U10.5 | length 855
  Top Layer w10: v1(-686,493) -607,572 v1(-607,621.81)
  Bottom Layer w8: U8.13@-826,381.4 -826,481 -790,517 -710,517 v1(-686,493)
  Bottom Layer w10: U10.5@-726.93,960.56 -684.56,960.56 -588,864 -588,640.81 v1(-607,621.81)
TMC_2###: D20.4 U10.6 | length 258.1
  Bottom Layer w8: D20.4@-875.32,1117.31 -875.32,1058.82 -752.12,935.62 ccw(c-750.55,937.18) -750.55,934.97 U10.6@-726.93,934.97
USB_DM: D14.3 J1.A7 J1.B7 J3.A3 | length 728.9
  Top Layer w8: D14.3@-698.08,390.69 cw(c-694.28,386.88) -694.28,392.26 v1(-674.5,392.26) ccw(c-647.59,419.18) -647.59,381.11 J1.A7@-601.69,381.11 ; J1.B7@-551.31,361.31 J1.B7@-551,361
  Top Layer w10: J1.B7@-545,361.43 -516.48,361.43 -503.87,348.81 v1(-503.81,348.81) -468.19,348.81 -439,378 -357,378 v1(-225,246)
  Bottom Layer w8: v1@-681.5,392.26 v1(-674.5,392.26) -547.26,392.26 v1(-503.81,348.81)
  Bottom Layer w10: J3.A3@-225,205.99 v1(-225,246) v1@-225,247
USB_DP: D14.2 J1.A6 J1.B6 J3.A4 | length 843
  Top Layer w8: D14.2@-698.08,351.32 ccw(c-691.86,357.53) -691.86,348.74 v1(-674.5,348.74) cw(c-643.88,318.12) -643.88,361.43 J1.A6@-601.69,361.43 ; J1.B6@-545,381.11 J1.B6@-544.94,381.06
  Top Layer w10: J1.B6@-544.94,381.06 v1@-481,381.06 ; v1(-481,381) -463,399 -273,399 -187.5,313.5 v1(-187.5,246)
  Bottom Layer w8: v1(-674.5,348.74) -655.91,367.33 -569.33,367.33 -520,318 -498,318 -481,335 v1(-481,381)
VC: C42.1 U3.3 | length 47.8
  Top Layer w22: v1@455,2215 v1@455.31,2214.69
  Bottom Layer w8: U3.3@371.06,2085 371.06,2101.94
  Bottom Layer w22: v1@455,2215 455.31,2214.69 455.31,2185.69 C42.1@456,2185
  other v1: 386.06,2100.94 455,2216 455.31,2242.47
VCC: C30.1 R23.2 U6.29 | length 194.3
  Top Layer w10: U6.29@671.61,627.84 734.16,627.84 758.63,603.37 783.29,603.37 C30.1@785.29,605.37
  Top Layer w22: C30.1@785.29,605.37 C30.1@786,604.66 ; R23.2@828,557 R23.2@829,556
  Top Layer w25: C30.1@786,604.66 787.79,602.87 787.79,596.14 828,555.92 R23.2@828,557
VCC#: C7.1 D1.1 U1.7 U1.9 | length 108.7
  Top Layer w10: v1@-889.31,1995.1 -889.19,1975.19
  Bottom Layer w10: v1(-888,2005) -887.82,2005.18 -870.26,2005.18 -853.07,2022.37 -847.21,2028.23 cw(c-839.59,2021.77) -846.6,2028.89 -843.68,2031.77 -810.4,2031.77 U1.9@-810.32,2031.69
  other v1: -885,1921 -859,1921 -885,1948.02 -859,1948.02
VCC##: C8.1 C10.1 C36.2 D1.2 R3.1 R32.2 | length 179.4
  Top Layer w40: -946.31,1820 -946.31,1868
  Bottom Layer w25: C10.1@-924,1815 C8.1@-873,1815 -872,1816 v1(-841,1816)
  Bottom Layer w30: C10.1@-924,1815 R3.1@-924,1863
  other v1: -960,1809 -960,1838.5 -960,1868 -942.31,2182.69
VCC_3V3_M: C13.1 C51.1 C52.1 C61.1 D19.5 D20.5 D21.5 FB3.2 P5.1 R10.1 RF1.2 RF2.2 U6.20 U8.16 U9.16 U10.14 | length 2301.5
  Top Layer w10: U6.20@533.81,490.05 533.81,527.48 cw(c551.52,527.48) v1(539,540) ; D19.5@550.1,365 551,364.1 D19.5@551,358.61 ; 626.77,365 cw(c626.77,362.85) 628.29,364.37
  Top Layer w22: v1(-539,181) -361.21,181 -339,203.21 v1(-339,301) ; 690.14,379.69 692.02,379.69
  Top Layer w25: v1(-937,331) -963,357 v1(-963,863) -963,1013 v1(-905,1071)
  Bottom Layer w8: v1@-895,1070 D20.5@-895,1117.31
  Bottom Layer w12: v1(-963,863) -941,841 D21.5@-908.69,841 ; U10.14@-947.4,1062.92 U10.14@-944.54,1065.78
  Bottom Layer w20: v1(-937,331) -891,285 -737,285 -633,181 v1(-539,181) ; U9.16@454,699 603.67,699 v1(750.84,551.84)
  Bottom Layer w22: U10.14@-944.54,1065.78 U10.14@-944.32,1066 ; v1(-371.75,481) -371.75,379.75 -339,347 v1(-339,301)
  Bottom Layer w30: C51.1@-943,366 C51.1@-940.5,366 ; v1(-937,331) C51.1@-937,360
  other v1: 717,337 717,361.54 563,365 656,373.19 1277,1629 1236.29,1653.37 1201,1685 1275,1685
  other v2: 969,1915 969,1940 969,1965
VCC_3V8: C33.1 C39.2 FB2.2 U2.2 U2.3 U4.2 U4.6 | length 726.4
  Top Layer w22: FB2.2@-352.81,2014.63 FB2.2@-352,2015.44 -288,2015.44 -284.71,2018.73 v1@-284.71,2023.37
  Top Layer w25: -357,1973 -352,1978
  Top Layer w50: v1(-559,1794) -516.43,1836.57 cw(c-445.72,1765.86) -515.31,1837.67 cw(c-445.72,1765.86) -445.72,1865.86 ccw(c-445.72,1947.54) -388,1889.75 ; -387.97,1889.78 -386.29,1891.46 ccw(c-457,1962.17) -357,1962.17 -357,1973 -357,1996
  Bottom Layer w10: U4.2@-210.71,1972.96 U4.2@-209.81,1973.87 ; v1@-187.27,1984.28 v1(-185.01,1984.28)
  Bottom Layer w12: U4.2@-210.71,1972.96 -201.86,1972.96 ccw(c-201.86,1986.32) -192.41,1976.87 v1(-185.01,1984.28)
  Bottom Layer w50: U2.3@-732,1583 -723.46,1583 ccw(c-723.46,1644.46) -680,1601 ccw(c-708.97,1629.97) -668,1629.97 -668,1643.58 cw(c-568,1643.58) -638.71,1714.29 v1(-559,1794)
  other v1: -320,2019.37 -292.71,2019.37
VCC_12V: C4.1 C5.1 C6.1 C14.1 C48.1 FB1.2 P3.1 R29.2 R31.2 R41.2 U1.3 U5.6 U6.3 U6.4 | length 406.6
  Top Layer w10: C14.1@265,757 265,755.24 275.37,744.87 275.37,732.58 280.31,727.64 ; U6.3@317.29,727.15 322.55,721.89 U6.3@322.55,721
  Top Layer w40: v1@174.29,873.37 265,782.66 C14.1@265,757 ; v1@441.05,1845 v1@441.05,1872.05
  Bottom Layer w10: U1.3@-660.71,2051.37 -632.71,2051.37 -624.71,2059.37 -624.71,2098.37
  Bottom Layer w35: v1(2,1946) 103.88,1946
  Bottom Layer w40: 917,2014 918,2013
  other v1: 173.29,873.37 924,1802 950.09,1802 976.18,1802 1002.26,1802 371,1812 397.52,1812.29 422.79,1812 449.05,1812 924,1827 950.09,1827 976.18,1827 371,1845 397.52,1845.29 422.79,1845 449.05,1845 371,1878 396.52,1878.29 422.79,1878 449.05,1878 -487,1926 -459,1926 -487,1953 -459,1953 -487,1980 -459,1980 -487,2007 -459,2007 -487,2034 847,2042 874,2042 847,2067 874,2067 -616,2083
VDD_3V3: C53.1 C54.1 D13.1 FB4.2 J3.B1 R33.2 R34.2 R46.2 RF3.2 RF4.2 U8.1 U9.1 | length 1585.2
  Top Layer w25: -719.37,1929 -719.3,1929 ; R34.2@745,257 v1(780,257)
  Top Layer w30: -770,2244 -770,1972.17 ccw(c-734.88,1972.17) -759.66,1947.29 ccw(c-715.44,1991.61) -715.64,1929 ; -719.3,1929 -715.64,1929 ; -715.37,1929 cw(c-715.44,1991.61) -715.64,1929 ; v1(-558,1698) -608.72,1748.72 cw(c-540.43,1817) -619.11,1761 cw(c-540.43,1817) -637,1817 -637,1853.52 ccw(c-727.48,1853.52) -663.5,1917.5 ccw(c-691.26,1889.74) -691.26,1929 -715.64,1929
  Bottom Layer w8: 898.5,689 935,689
  Bottom Layer w12: v1(780,257) 879,257 944,322 944,679 ; U9.1@852.07,695 U9.1@858.07,689
  Bottom Layer w18: U9.1@839,695 U9.1@840,696
  Bottom Layer w22: R46.2@600,158 R46.2@601.87,156.13 ; v1(602,127) 607.5,132.5 v1@607.5,135
  Bottom Layer w25: J3.B1@-325,422.53 -325,424 v1(-324,425) ; R33.2@532,228 532,190 564,158 R46.2@600,158
  Bottom Layer w30: C53.1@-945,606 C53.1@-942.5,606 ; C53.1@-941,606 C53.1@-942.5,606 ; v1(-839,696) -875.22,696 -930,641.22 -930,618.5 C53.1@-942.5,606
  other v1: 294,77.81 327,77.81
VOUT: C46.2 DF2.1 L2.2 U3.1 | length 704
  Bottom Layer w12: 323,2322.42 326.79,2326.21 332.19,2331.6 332.19,2348.57 343.61,2360 L2.2@360.58,2360
  Bottom Layer w18: C46.2@102,2097.5 102,2006 125,1983 288,1983 323,2018 323,2322.42
  other v1: 234,2333 260,2333 286,2333 310.3,2333 334.61,2333 358.91,2333 383.21,2333 407.51,2333 234,2357.3 260,2357.3 286,2357.3 310.3,2357.3 334.61,2357.3 358.91,2357.3 383.21,2357.3 407.51,2357.3 234,2381.61 260,2381.61 286,2381.61 234,2405.91 260,2405.91 286,2405.91 234,2430.21 260,2430.21 286,2430.21 234,2454.51 260,2454.51 286,2454.51 234,2478.82 260,2478.82 286,2478.82 234,2503.12 260,2503.12 234,2527.42 260,2527.42
VOUT_5V: C29.1 P4.1 R23.1 U6.5 | length 121.4
  Top Layer w12: v1@289,698 290.3,698 301.4,686.9 U6.5@336.96,686.9
  Top Layer w22: C29.1@265,696.3 266.39,697.69 288.69,697.69 v1@289,698 ; R23.1@889,556 889.69,555.31 v1@919,555.31
  Top Layer w25: P4.1@-469.05,625 -467,622.95 v1(-467,612)
  other v1: 919,555 292,699
VS: C1.1 C15.1 C16.1 C18.1 C19.1 C20.2 C21.1 C22.1 C40.1 C41.2 CF3.2 Q2.5 Q2.6 Q2.7 Q2.8 Q4.5 Q4.6 Q4.7 Q4.8 Q5.2 U3.6 U3.8 U6.33 | length 440.5
  Top Layer w10: U6.33@671.61,706.58 760.78,706.58 781.19,727 C20.2@789,727 ; C20.2@778.08,723.77 780.61,726.31 C20.2@792,726.31 ; C20.2@787.96,738.77 C20.2@794.39,745.2 ; C18.1@867.83,745.2 867.83,754.83 v1@874.59,761.59 ; v1(872,764.19) v1@874.59,761.59 ; v1@891,764 877,764 v1@874.59,761.59
  Top Layer w22: C1.1@95.02,2152.5 C1.1@131.74,2152.5
  Bottom Layer w10: U3.8@162,2185 204,2185 206,2183 ; U3.6@171,2084.5 191.5,2084.5 v1@206,2099
  Bottom Layer w12: 182,2206 207,2206 208.35,2204.65 v1@208.35,2103.83
  other v1: 946,730 946,755 897,764.19 922,764.19 845,1043 872,1043 899,1043 926,1043 953,1043 980,1043 1007,1043 1034,1043 845,1070 872,1070 899,1070 926,1070 953,1070 980,1070 1007,1070 1034,1070 953,1097 980,1097 1007,1097 1034,1097 487.83,1686 513.92,1686 540.01,1686.1 566.1,1686.1 868.74,1686 894.82,1686 920.91,1686.1 947,1686.1 126.29,1696.6 154,1696.6 182,1696.6 209.71,1696.6 237.71,1696.6 265.43,1696.6 487.83,1718.9 513.92,1718.9 540.01,1718.9 566.1,1718.9 868.74,1718.9 894.82,1718.9 920.91,1718.9 947,1718.9 126.29,1723.52 154,1723.52 182,1723.52 209.71,1723.52 237.71,1723.52 265.43,1723.52 126.29,1750.44 154,1750.44 182,1750.44 209.71,1750.44 237.71,1750.44 265.43,1750.44 487.83,1751.81 513.92,1751.81 540.01,1751.81 566.1,1751.81 868.74,1751.81 894.82,1751.81 -33.61,2003.24 -8.69,2003.24 16.24,2003.24 41.16,2003.24 66.08,2003.24 -33.61,2030.16 -8.69,2030.16 16.24,2030.16 41.16,2030.16 66.08,2030.16 -33.61,2057.08 -8.69,2057.08 16.24,2057.08 41.16,2057.08 66.08,2057.08 207,2070 -33.61,2084 -8.69,2084 16.24,2084 41.16,2084 66.08,2084 207,2093.83 -33.61,2112.92 -8.69,2112.92 16.24,2112.92 41.16,2112.92 66.08,2112.92 -33.61,2142.84 -8.69,2142.84 16.24,2142.84 41.16,2142.84 66.08,2142.84 138,2212 166,2212
VS###: C62.2 D15.1 F1.1 Q5.3 R21.2
  other v1: 47.61,1198.09 73.23,1198.09 47.61,1224.09 73.23,1224.09 141.26,1394.84 166,1394 141.26,1421.5 166,1421.5 141.26,1449 166,1449
pads on no net: J1.A2 J1.A3 J1.A4 J1.A8 J1.A9 J1.A10 J1.A11 J1.B2 J1.B3 J1.B4 J1.B8 J1.B9 J1.B10 J1.B11 J1.MH1 J1.MH2 J1.MP1 J1.MP2 J1.MP3 J1.MP4 J2.1 J2.2 J2.3 J2.6 J2.MH1 J2.MH2 J3.B11 J3.MH1 J3.MH2 J5.1 J5.2 J5.3 J5.6 J5.MH1 J5.MH2 J6.MP1 J6.MP2 J11.20 LED1. SW1.2 SW1.4 T1.2 T1.5 U6.25 U6.27 U8.7